# Altium PCB PCB_ARC_1.0.5.PcbDoc (part 3 of 4)
Units mil, origin at the board's own origin, x right, y up, seen from the top; angles counter-clockwise.
Board outline 3621 x 2945 mil, 2 copper layers (Top Layer, Bottom Layer), stack 62 mil thick; 201 components, 125 nets, 582 pads, 196 vias.
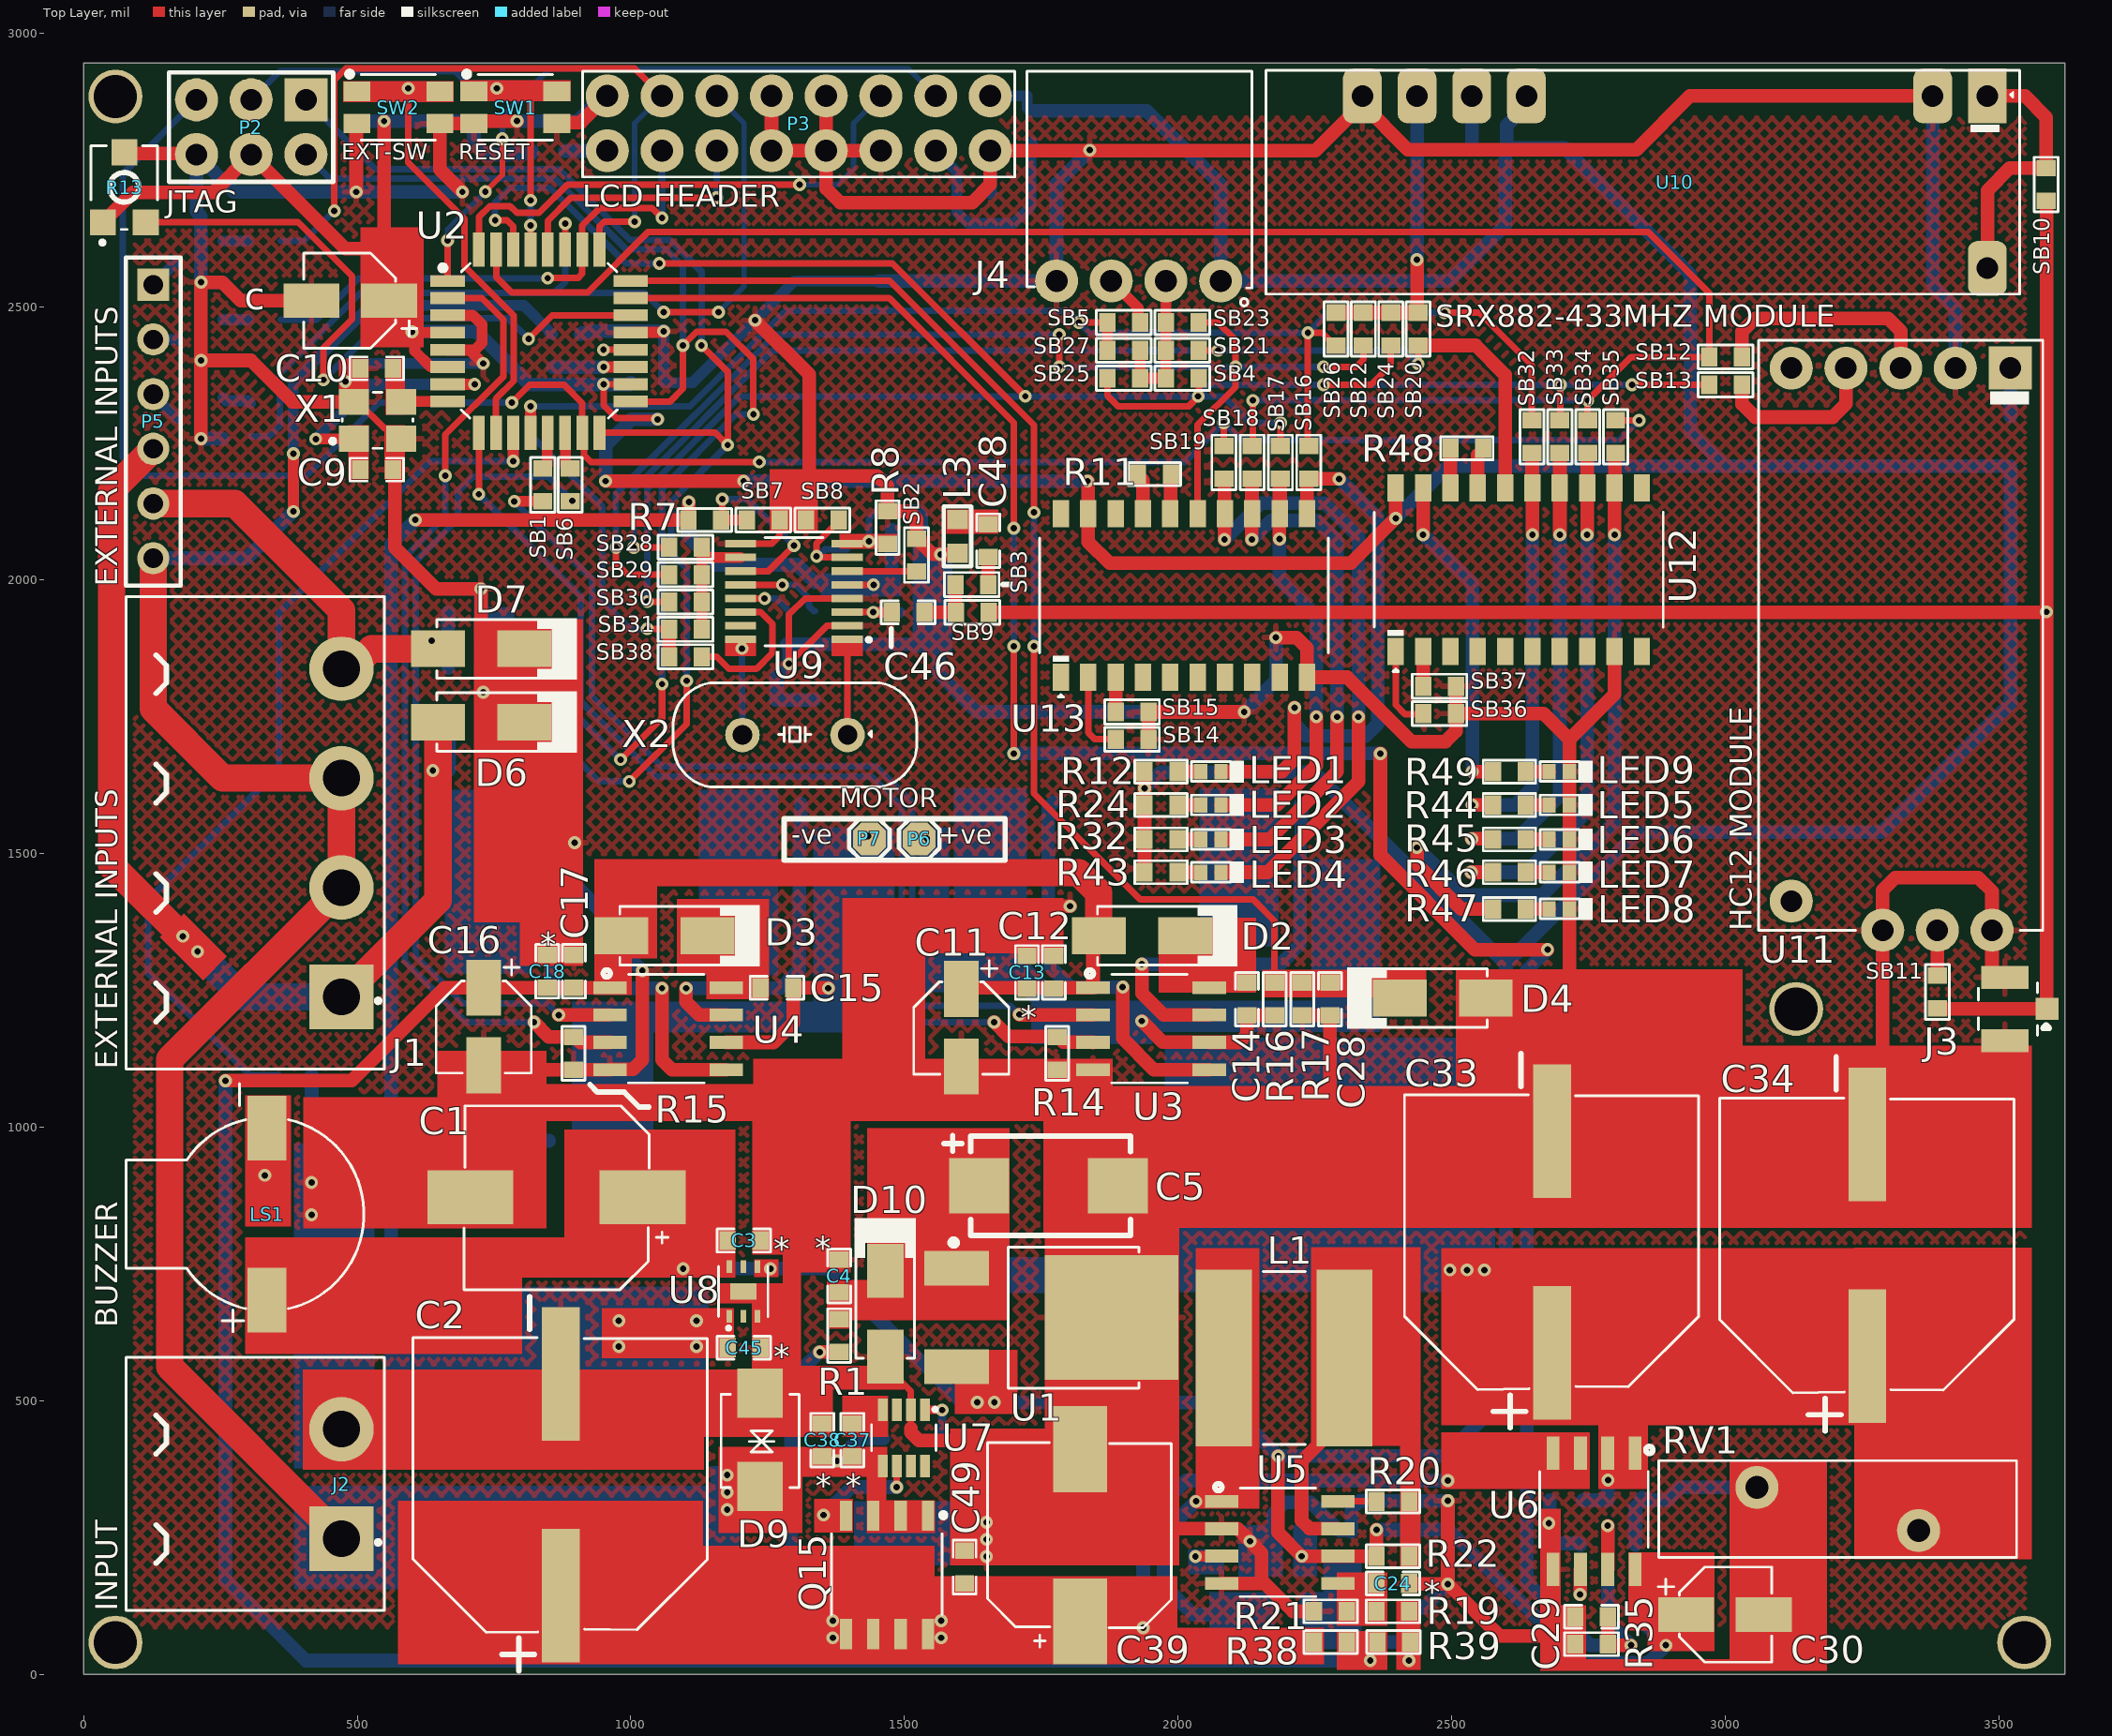
[diagram p0: Top Layer view]

## Part data (continued)
U1: "IC REG LINEAR 5V 500MA DPAK", Case/Package=DPAK, Dropout Voltage=2V, Manufacturer="ON Semiconductor", Manufacturer Part Number=MC78M05ACDTRKG, Max Input Voltage=35V, Max Operating Temperature=125°C, Max Output Current=500mA, Max Output Voltage=5.1V, Min Input Voltage=7V, Min Operating Temperature=0°C, Min Output Voltage=5V, Output Voltage Accuracy=2%, Package Quantity=1, Power Rating=5W, Power Supply Rejection Ratio (PSRR)=80dB, Quiescent Current=6mA, Accuracy=2%, Category="Voltage Regulators - Linear", ComponentLink1Description=https://datasheet.ciiva.com/8233/mc78m00-d-8233193.pdf?src-supplier=Avnet, ComponentLink1URL=https://datasheet.ciiva.com/8233/mc78m00-d-8233193.pdf?src-supplier=Avnet, ComponentLink2Description=https://datasheet.ciiva.com/2042/mc78m00-d-2042507.pdf?src-supplier=Digi-Key, ComponentLink2URL=https://datasheet.ciiva.com/2042/mc78m00-d-2042507.pdf?src-supplier=Digi-Key, ComponentLink3Description=https://datasheet.ciiva.com/8234/mc78m00-d-8234043.pdf?src-supplier=Avnet, ComponentLink3URL=https://datasheet.ciiva.com/8234/mc78m00-d-8234043.pdf?src-supplier=Avnet, ComponentLink4Description=https://datasheet.ciiva.com/2042/mc78m00-d-2042508.pdf?src-supplier=Digi-Key, ComponentLink4URL=https://datasheet.ciiva.com/2042/mc78m00-d-2042508.pdf?src-supplier=Digi-Key, ComponentLink5Description=https://datasheet.ciiva.com/2042/mc78m00-d-2042509.pdf?src-supplier=Digi-Key, ComponentLink5URL=https://datasheet.ciiva.com/2042/mc78m00-d-2042509.pdf?src-supplier=Digi-Key, ComponentLink6Description=https://datasheet.ciiva.com/4882/mc78m00-d-88441-4882285.pdf?src-supplier=Mouser, ComponentLink6URL=https://datasheet.ciiva.com/4882/mc78m00-d-88441-4882285.pdf?src-supplier=Mouser, ComponentLink7Description=https://datasheet.ciiva.com/16455/mc78m00-d-16455407.pdf?src-supplier=Future+Electronics, ComponentLink7URL=https://datasheet.ciiva.com/16455/mc78m00-d-16455407.pdf?src-supplier=Future+Electronics, Halogen Free="Halogen Free", Height=2.38mm, Lead Free="Lead Free", Length=6.73mm, Mount="Surface Mount", Nominal Output Voltage=5V, Number of Outputs=1, Number of Pins=3, Number of Regulators=1, Output Current=500mA, Output Type=Fixed, Output Voltage=5V, Packaging="Tape and Reel", Polarity=Positive, Pricing 1="1=0.50430, 10=0.50340, 25=0.49850, 100=0.34200, 250=0.33860, 500=0.33520, 1000=0.23420, 3000=0.19890 (USD)", Radiation Hardening=No, REACH SVHC="No SVHC", RoHS=Yes, RoHS Compliant=Yes, Series=-, Stock 1=4440, Supplier 1="Arrow Electronics", Supplier Part Number 1=MC78M05ACDTRKG, Width=6.22mm
U2: "IC MCU 8BIT 16KB FLASH 32TQFP", Case/Package=A, Frequency=20MHz, Manufacturer="Microchip / Atmel", Max Operating Temperature=85°C, Max Supply Voltage=5.5V, Min Operating Temperature=-40°C, Min Supply Voltage=1.8V, Package Quantity=250, Supplier Part Number 1=7153782, Category=Microcontrollers, ComponentLink1Description=https://datasheet.ciiva.com/4837/doc8271-50296-4837968.pdf?src-supplier=Mouser, ComponentLink1URL=https://datasheet.ciiva.com/4837/doc8271-50296-4837968.pdf?src-supplier=Mouser, ComponentLink2Description=https://datasheet.ciiva.com/22651/1691443-22651039.pdf?src-supplier=Farnell, ComponentLink2URL=https://datasheet.ciiva.com/22651/1691443-22651039.pdf?src-supplier=Farnell, ComponentLink3Description=https://datasheet.ciiva.com/1157/1691443-1157400.pdf?src-supplier=Element14, ComponentLink3URL=https://datasheet.ciiva.com/1157/1691443-1157400.pdf?src-supplier=Element14, Contact Plating=Tin,Matte, Core Architecture=AVR, Data Bus Width=8b, Height=1.05mm, Interface=SPI,2-Wire,I2C,UART,USART,Serial, Lead Free="Lead Free", Length=7mm, Manufacturer Part Number=ATMEGA168A-AU, Max Frequency=20MHz, Memory Size=16KB, Memory Type=FLASH, Mount="Surface Mount", Number of ADC Channels=8, Number of I2C Channels=1, Number of I/Os=23, Number of Pins=32, Number of Programmable I/O=23, Number of PWM Channels=6, Number of SPI Channels=1, Number of Timers/Counters=3, Oscillator Type=Internal, Packaging=Tray, Peripherals="Brown-out Detect/Reset,POR,PWM,WDT", Radiation Hardening=No, RAM Size=1KB, REACH SVHC="No SVHC", RoHS=Yes, RoHS Compliant=Yes, Series="AVR® ATmega", Supplier 1=RSComponents, Watchdog Timer=Yes, Width=7mm
U3 U4: "IC DRIVER HIGH/LOW SIDE 8SOIC", Case/Package=SOIC, Manufacturer=Infineon, Manufacturer Part Number=IR2104STRPBF, Max Operating Temperature=150°C, Max Output Current=360mA, Max Supply Voltage=20V, Min Operating Temperature=-40°C, Min Supply Voltage=10V, Package Quantity=1, Supplier Part Number 1=40M8006, Category="Gate Drivers", Channel Type=Synchronous, Fall Time=90ns, Halogen Free="Not Halogen Free", Height=0.059inch, Lead Free="Lead Free", Length=0.196inch, Mount="Surface Mount", Number of Channels=2, Number of Drivers=2, Number of Outputs=2, Number of Pins=8, Output Current=360mA, Packaging="Cut Tape", Pricing 1="1=3.54000, 10=3.19000, 25=3.01000 (USD)", Propagation Delay=680ns, REACH SVHC="No SVHC", RoHS=Yes, RoHS Compliant=Yes, Stock 1=1645, Supplier 1=Newark, Width=0.157inch
U5: "IC REG BUCK BOOST INV ADJ 8SOIC", Case/Package=SOIC, Manufacturer="ON Semiconductor", Max Input Voltage=40V, Max Operating Temperature=70°C, Max Output Current=1.5A, Min Input Voltage=3V, Min Operating Temperature=0°C, Min Output Voltage=1.25V, Package Quantity=1, Switching Frequency=100kHz, Category="Voltage Regulators - Switching", ComponentLink1Description=https://datasheet.ciiva.com/34301/871666-34301629.pdf?src-supplier=Jameco, ComponentLink1URL=https://datasheet.ciiva.com/34301/871666-34301629.pdf?src-supplier=Jameco, ComponentLink2Description=https://datasheet.ciiva.com/15112/getdatasheetpartid-59933-15112667.pdf?src-supplier=Verical, ComponentLink2URL=https://datasheet.ciiva.com/15112/getdatasheetpartid-59933-15112667.pdf?src-supplier=Verical, ComponentLink3Description=https://datasheet.ciiva.com/2025/mc34063a-d-2025168.pdf?src-supplier=Digi-Key, ComponentLink3URL=https://datasheet.ciiva.com/2025/mc34063a-d-2025168.pdf?src-supplier=Digi-Key, ComponentLink4Description=https://datasheet.ciiva.com/3217/mc34063a-d-3217624.pdf?src-supplier=Avnet, ComponentLink4URL=https://datasheet.ciiva.com/3217/mc34063a-d-3217624.pdf?src-supplier=Avnet, ComponentLink5Description=https://datasheet.ciiva.com/3217/mc34063a-d-3217493.pdf?src-supplier=Avnet, ComponentLink5URL=https://datasheet.ciiva.com/3217/mc34063a-d-3217493.pdf?src-supplier=Avnet, ComponentLink6Description=https://datasheet.ciiva.com/2025/mc34063a-d-2025169.pdf?src-supplier=Digi-Key, ComponentLink6URL=https://datasheet.ciiva.com/2025/mc34063a-d-2025169.pdf?src-supplier=Digi-Key, ComponentLink7Description=https://datasheet.ciiva.com/2025/mc34063a-d-2025167.pdf?src-supplier=Digi-Key, ComponentLink7URL=https://datasheet.ciiva.com/2025/mc34063a-d-2025167.pdf?src-supplier=Digi-Key, Contact Plating=Tin,Matte, Halogen Free="Halogen Free", Height=1.5mm, Lead Free="Lead Free", Length=5mm, Manufacturer Part Number=MC34063ADR2G, Max Output Voltage=40V, Mount="Surface Mount", Number of Outputs=1, Number of Pins=8, Output Current=1.5A, Output Type=Adjustable, Output Voltage=40V, Packaging="Tape and Reel", Pricing 1="1=0.59300, 10=0.47930, 25=0.47460, 100=0.29030, 250=0.28740, 500=0.28460, 1000=0.25300, 3000=0.22150 (USD)", Radiation Hardening=No, REACH SVHC="No SVHC", RoHS=Yes, RoHS Compliant=Yes, Series=-, Stock 1=2000, Supplier 1="Arrow Electronics", Supplier Part Number 1=MC34063ADR2G, Switching Frequency-Max=100kHz, Synchronous Rectifier=No, Width=4mm
U6: "SENSOR CURRENT HALL 20A AC/DC", Case/Package=SOIC, Current Sensing=20A, Frequency=80kHz, Manufacturer="Allegro MicroSystems", Max Operating Temperature=85°C, Max Supply Current=13mA, Max Supply Voltage=5.5V, Min Operating Temperature=-40°C, Min Supply Voltage=4.5V, Operating Supply Voltage=5V, Output Current=10mA, Package Quantity=1, Supplier Part Number 1=6807135, Accuracy=1.5%, Bandwidth=80kHz, Category="Magnetic Sensors", ComponentLink1Description=https://datasheet.ciiva.com/15099/getdatasheetpartid-312820-15099471.pdf?src-supplier=Verical, ComponentLink1URL=https://datasheet.ciiva.com/15099/getdatasheetpartid-312820-15099471.pdf?src-supplier=Verical, ComponentLink2Description=https://datasheet.ciiva.com/1165/64754-1165093.pdf?src-supplier=Element14, ComponentLink2URL=https://datasheet.ciiva.com/1165/64754-1165093.pdf?src-supplier=Element14, ComponentLink3Description=https://datasheet.ciiva.com/3272/acs712-datasheet-3272423.pdf?src-supplier=Avnet, ComponentLink3URL=https://datasheet.ciiva.com/3272/acs712-datasheet-3272423.pdf?src-supplier=Avnet, ComponentLink4Description=https://datasheet.ciiva.com/3271/acs712-datasheet-3271995.pdf?src-supplier=Avnet, ComponentLink4URL=https://datasheet.ciiva.com/3271/acs712-datasheet-3271995.pdf?src-supplier=Avnet, ComponentLink5Description=https://datasheet.ciiva.com/16636/acs712-datasheet-16636599.pdf?, ComponentLink5URL=https://datasheet.ciiva.com/16636/acs712-datasheet-16636599.pdf?, Height=1.5mm, Lead Free="Lead Free", Length=4.9mm, Linearity=1.5%, Manufacturer Part Number=ACS712ELCTR-20A-T, Number of Channels=1, Number of Pins=8, Packaging="Tape and Reel", Polarity=Bidirectional, Pricing 1="1=6.70000, 25=4.23000, 100=3.64000, 250=3.35000, 500=3.04000 (GBP)", Quiescent Current=10mA, Radiation Hardening=No, REACH SVHC="No SVHC", Response Time=5us, RoHS=Yes, RoHS Compliant=Yes, Sensitivity=100mV/A, Series=-, Stock 1=93, Supplier 1=RSComponents, Termination=SMD/SMT, Width=3.9mm
U7: "REVERSE POLARITY PROTECTION CONT", Manufacturer="Texas Instruments", Supplier Part Number 1=595-LM74500QDDFRQ1, Category="Battery Management", Manufacturer Part Number=LM74500QDDFRQ1, Pricing 1="1=1.77000, 10=1.60000, 50=1.51000, 100=1.29000, 1000=0.87600, 10000=0.87500 (USD)", RoHS=No, Supplier 1=Mouser
U8: "IC REG LINEAR 3.3V 150MA 6WSON", Dropout Voltage=80mV, Manufacturer="TI National Semiconductor", Max Input Voltage=5.5V, Max Operating Temperature=85°C, Max Output Current=150mA, Max Supply Current=230uA, Min Input Voltage=2.5V, Min Operating Temperature=-40°C, Nominal Output Voltage=3.3V, Output Voltage Accuracy=2%, Package Quantity=1000, Power Supply Rejection Ratio (PSRR)=40dB, Quiescent Current=50uA, Supplier Part Number 1=LP5900SD-3.3/NOPBCT-ND, Accuracy=2%, Category="Voltage Regulators - Linear", ComponentLink1Description=https://datasheet.ciiva.com/3223/lp5900-3223991.pdf?src-supplier=Avnet, ComponentLink1URL=https://datasheet.ciiva.com/3223/lp5900-3223991.pdf?src-supplier=Avnet, ComponentLink2Description=https://datasheet.ciiva.com/6598/lp5900-6598143.pdf?src-supplier=Digi-Key, ComponentLink2URL=https://datasheet.ciiva.com/6598/lp5900-6598143.pdf?src-supplier=Digi-Key, ComponentLink3Description=https://datasheet.ciiva.com/6598/lp5900-6598142.pdf?src-supplier=Digi-Key, ComponentLink3URL=https://datasheet.ciiva.com/6598/lp5900-6598142.pdf?src-supplier=Digi-Key, Height=0.8mm, Lead Free="Lead Free", Length=2.2mm, Manufacturer Part Number=LP5900SD-3.3/NOPB, Max Supply Voltage=5.5V, Min Supply Voltage=2.5V, Mount="Surface Mount", Number of Outputs=1, Number of Pins=6, Number of Regulators=1, Output Configuration=Positive, Output Current=150mA, Output Type=Fixed, Output Voltage=3.3V, Packaging="Tape and Reel", Polarity=Positive, Pricing 1="1=1.01000, 10=0.90700, 25=0.86080, 100=0.70700, 250=0.66092, 500=0.58406 (USD)", Radiation Hardening=No, REACH SVHC="No SVHC", RoHS=Yes, Series=-, Stock 1=36260, Supplier 1=Digi-Key, Termination=SMD/SMT, Width=2.5mm
U9: "RF RX ASK/OOK 300-450MHZ 16QSOP", Case/Package=QSOP, Current - Receiving=6mA, Frequency=450MHz, Manufacturer=Microchip, Max Operating Temperature=105°C, Max Supply Voltage=3.6V, Min Frequency=300MHz, Min Operating Temperature=-40°C, Min Supply Voltage=3V, Nominal Supply Current=4.3mA, Operating Frequency="300 MHz to 450 MHz", Package Quantity=98, Bandwidth=330kHz, Category="Interface ICs", ComponentLink1Description=https://datasheet.ciiva.com/2798/micrf220-2798468.pdf?src-supplier=Digi-Key, ComponentLink1URL=https://datasheet.ciiva.com/2798/micrf220-2798468.pdf?src-supplier=Digi-Key, ComponentLink2Description=https://datasheet.ciiva.com/30475/0900766b81133813-30475820.pdf?src-supplier=RSComponents, ComponentLink2URL=https://datasheet.ciiva.com/30475/0900766b81133813-30475820.pdf?src-supplier=RSComponents, ComponentLink3Description=https://datasheet.ciiva.com/1164/micrf220-1164232.pdf?src-supplier=Element14, ComponentLink3URL=https://datasheet.ciiva.com/1164/micrf220-1164232.pdf?src-supplier=Element14, Data Rate=20Kbps, Depth=3.91mm, Height=1.47mm, Lead Free="Lead Free", Length=4.9mm, Manufacturer Part Number=MICRF220AYQS, Max Frequency=450MHz, Mount="Surface Mount", Number of Pins=16, Packaging=Rail/Tube, Pricing 1="1=2.15000 (USD)", Radiation Hardening=No, REACH SVHC="No SVHC", RoHS=Yes, RoHS Compliant=Yes, Sensitivity=-112.5dBm, Series=QwikRadio®, Stock 1=5131, Supplier 1="Arrow Electronics", Supplier Part Number 1=MICRF220AYQS, Supply Current=4.3mA, Width=3.91mm
U10: "RF Modules ROHS", LCSC Part Number=C5126754, Manufacturer=G-NiceRF, ComponentLink1Description=LCSC, ComponentLink1URL=https://www.lcsc.com/product-detail/RF-Modules_G-NiceRF-STX882S-433MHZ-SRX882-433MHZ-SW433-TH32_C5126754.html, Manufacturer Part Number=SRX882-433MHZ
U11: "433Mhz SI4463 HC-12 Wireless Serial Port Module", Manufacturer Part Number=HC-12, ComponentLink1Description=Aliexpress, ComponentLink1URL=https://www.aliexpress.com/item/1005002117548373.html?spm=a2g0o.productlist.main.1.451c79c6Vo7dNy&algo_pvid=93082d1e-6c79-45a0-b51e-4c9c862db0c1&algo_exp_id=93082d1e-6c79-45a0-b51e-4c9c862db0c1-0&pdp_ext_f=%7B%22sku_id%22%3A%2212000018797976000%22%7D&pdp_npi=2%40dis%21USD%214.4%213.74%21%21%21%21%21%4021224e9b16655822763592696d06c5%2112000018797976000%21sea&curPageLogUid=P8YFabe8JKJ6
U12: "SOP-20_300mil Interface - Specialized ROHS", LCSC Part Number=C80963, Manufacturer=PTC, ComponentLink1Description=LCSC, ComponentLink1URL=https://www.lcsc.com/product-detail/Interface-Specialized_PTC-Princeton-Tech-PT2272-L4S_C80963.html, Manufacturer Part Number=PT2272-L4S
U13: "Remote Control Decoder, SMD, SOP20", Manufacturer=Holtek, Max Operating Temperature=75°C, Max Supply Voltage=12V, Min Operating Temperature=-20°C, Min Supply Voltage=2.4V, Nominal Supply Current=200uA, Supplier Part Number 1=53M7832, Category="Integrated Circuits (ICs)", ComponentLink1Description=https://datasheet.ciiva.com/1176/1525377-1176091.pdf?src-supplier=Newark, ComponentLink1URL=https://datasheet.ciiva.com/1176/1525377-1176091.pdf?src-supplier=Newark, ComponentLink2Description=https://datasheet.ciiva.com/1167/57850-1167133.pdf?src-supplier=Element14, ComponentLink2URL=https://datasheet.ciiva.com/1167/57850-1167133.pdf?src-supplier=Element14, Manufacturer Part Number=HT12D-20SOPLF, Number of Pins=20, Pricing 1="1=2.11000, 10=1.80000, 100=1.44000, 500=1.33000, 1000=1.19000, 2500=0.96900, 5000=0.93700 (USD)", REACH SVHC="No SVHC", RoHS=Yes, Supplier 1=Newark
X1: library part X322512MOB4SI, "12MHz SMD Crystal Resonator 12pF ±10ppm ±30ppm -40℃~+85℃ SMD3225-4P Crystals ROHS", Manufacturer="Yangxing Tech", Manufacturer Part Number=X322512MOB4SI
X2: library part S1C13523ZWFAC, "13.52313MHz In-line passive crystal oscillator 20pF 60Ω ±20ppm ±30ppm -40℃~+85℃ HC-49S-2P Crystals ROHS", LCSC Part Number=C2681243, Manufacturer=JYJE, Package=HC-49S-2P, ComponentLink1Description=LCSC, ComponentLink1URL=https://www.lcsc.com/product-detail/Crystals_JYJE-S1C13523ZWFAC_C2681243.html, Manufacturer Part Number=S1C13523ZWFAC

## Free pads (board coordinates)
  round 98.43 hole 78.74: MH1(58,2884) MH2(3130,1216) MH3(3547,58) MH4(58,58)

## Via types
v1: diameter 23.62, hole 11.81, Top Layer to Bottom Layer, tented both sides, 195 vias
v2: diameter 23.62, hole 11.81, Top Layer to Bottom Layer, 1 vias

## Nets (pads, with @x,y where several pads share a name; then routed paths per layer and width w, separated by ;. In a path a pad name is that pad's centre, name@x,y a point inside that pad or via, vN(x,y) a via of type N, cw(c..) or ccw(c..) an arc to the next point about the centre after c; other vN are vias at no path point)
\S\D\1\: R14.1 U2.9 U3.3 | length 1956.8
  Top Layer w12: v1(722,2157) 722.09,2157.09 U2.9@722.09,2269.43
  Top Layer w25: v1(1664,1192) 1690.5,1165.5 1774,1165.5 1774.5,1165 R14.1@1779,1165 ; R14.1@1790.81,1155.69 1844.01,1155.69 U3.3@1844.7,1155
  Bottom Layer w12: v1(722,2157) 908,1971 908,1779 1046,1641 1440.13,1641 1495,1586.13 1495,1228 1531,1192 v1(1664,1192)
\S\D\2\: R15.1 U2.2 U4.3 | length 1798.9
  Top Layer w12: v1(661,2191) 661,2266.05 767,2372.05 767,2475.83 727.33,2515.5 U2.2@665,2515.5
  Top Layer w25: v1(823,1192) 850,1165 R15.1@892.5,1165 ; R15.1@895,1165 897.5,1162.5 900,1162.5 907.5,1155 U4.3@961.7,1155
  Bottom Layer w12: v1(661,2191) 661,2116 587.5,2042.5 587.5,1302.5 698,1192 v1(823,1192)
ANT: C46.1 L2.1 U9.3 | length 130.6
  Top Layer w12: U9.3@1395.82,1941.38 v1@1442.88,1941.38
  Top Layer w20: v1@1442.88,1941.38 v1(1443,1941.25) C46.1@1476.53,1941.25
  Top Layer w25: C46.1@1476.53,1941.25 C46.1@1476.78,1941
  Bottom Layer w20: v1(1443,1941.25) L2.1@1492.47,1941.25
ANT#: C46.2 SB3.2 SB9.1 | length 108.6
  Top Layer w25: C46.2@1536.78,1941 SB9.1@1594,1941 1593.5,1941.5 1593.5,1991.5 SB3.2@1593,1992
ANT_HC12: SB11.1 U11.6 | length 83
  Top Layer w25: SB11.1@3388,1277 U11.6@3388,1360
ANT_SRX882: SB10.1 U10.1 U10.7 | length 483.4
  Top Layer w25: U10.7@3479.52,2570.04 3479.52,2712.52 3520,2753 SB10.1@3587,2753 3587,2846 3548,2885 U10.1@3479.52,2885
BATT_ADC: R2.1 R3.1 U2.19 | length 142.9
  Top Layer w20: v1(950,2389.51) U2.19@999.65,2389.51
  Bottom Layer w12: R2.1@857,2389 R2.1@857.51,2389.51
  Bottom Layer w25: R2.1@857.51,2389.51 v1(950,2389.51)
BUZZER: R5.2 U2.11 | length 1669.6
  Top Layer w20: v1(785.08,2217.45) U2.11@785.08,2269.43
  Bottom Layer w12: R5.2@357,1095 304,1095 118,1281 118,1416 357,1655 357,1941 633.45,2217.45 v1(785.08,2217.45)
CII: C24.1 R19.2 R21.2 U5.5 | length 175.7
  Top Layer w25: U5.5@2292.3,166 C24.1@2363,166 R19.2@2363,115 R21.2@2309,115
CNTRL2#: P2.5 SB19.2 SB35.2 U2.15 | length 3819.4
  Top Layer w12: v1(782.57,2324.43) 815.15,2357 878,2357 911.06,2323.94 U2.15@911.06,2269.43 914.2,2266.29 914.2,2228.8 927,2216 v1(1235,2216) ; SB19.2@2084,2245 v1(2084,2287.67) ; SB35.2@2800,2292 v1(2842.67,2292)
  Bottom Layer w12: P2.5@206,2878 71,2743 71,2224 104,2191 407,2191 540.22,2324.22 782.37,2324.22 v1(782.57,2324.43) ; v1(1235,2216) 2012.33,2216 v1(2084,2287.67) 2115.67,2256 2806.67,2256 v1(2842.67,2292)
CNTRL3#: P2.1 Q13.3 U2.16 | length 2315.1
  Top Layer w12: U2.16@942.56,2269.43 1154.57,2269.43 v1(1177,2247) 1177,2381 v1(1129,2429) ; v1(997,1632) 1102,1737 v1(1102,1816)
  Bottom Layer w12: P2.1@406,2878 533,2751 869.04,2751 998.04,2622 1071.04,2622 1129,2564.04 v1(1129,2429) ; Q13.3@861.65,1712.4 942.05,1632 v1(997,1632) ; v1(1102,1816) 1102,2021 1074,2049 1074,2144 v1(1177,2247)
CNTRL4#: P2.2 Q14.3 U2.17 | length 2390.6
  Top Layer w12: v1(981,1672) 1057,1748 v1(1057,1810) ; U2.17@999.65,2326.52 1071.52,2326.52 1095,2350 v1(1095,2429) 1120,2454 1174,2454 1224,2404 v1(1224,2303)
  Bottom Layer w12: P2.2@406,2778 450,2734 862,2734 991,2605 1064,2605 1095,2574 v1(1095,2429) ; Q14.3@859.85,1898.38 890,1868.23 890,1763 v1(981,1672) ; v1(1057,1810) 1057,2168 1192,2303 v1(1224,2303)